# Altium PCB li-ion-18650-capacity-meter.PcbDoc
Units mm, origin at the board's own origin, x right, y up, seen from the top; angles counter-clockwise.
Board outline 85 x 70 mm, 2 copper layers (Top Layer, Bottom Layer), stack 1.571 mm thick; 48 components, 35 nets, 160 pads, 8 vias.
Unrouted connection lines stored in the file: 1.
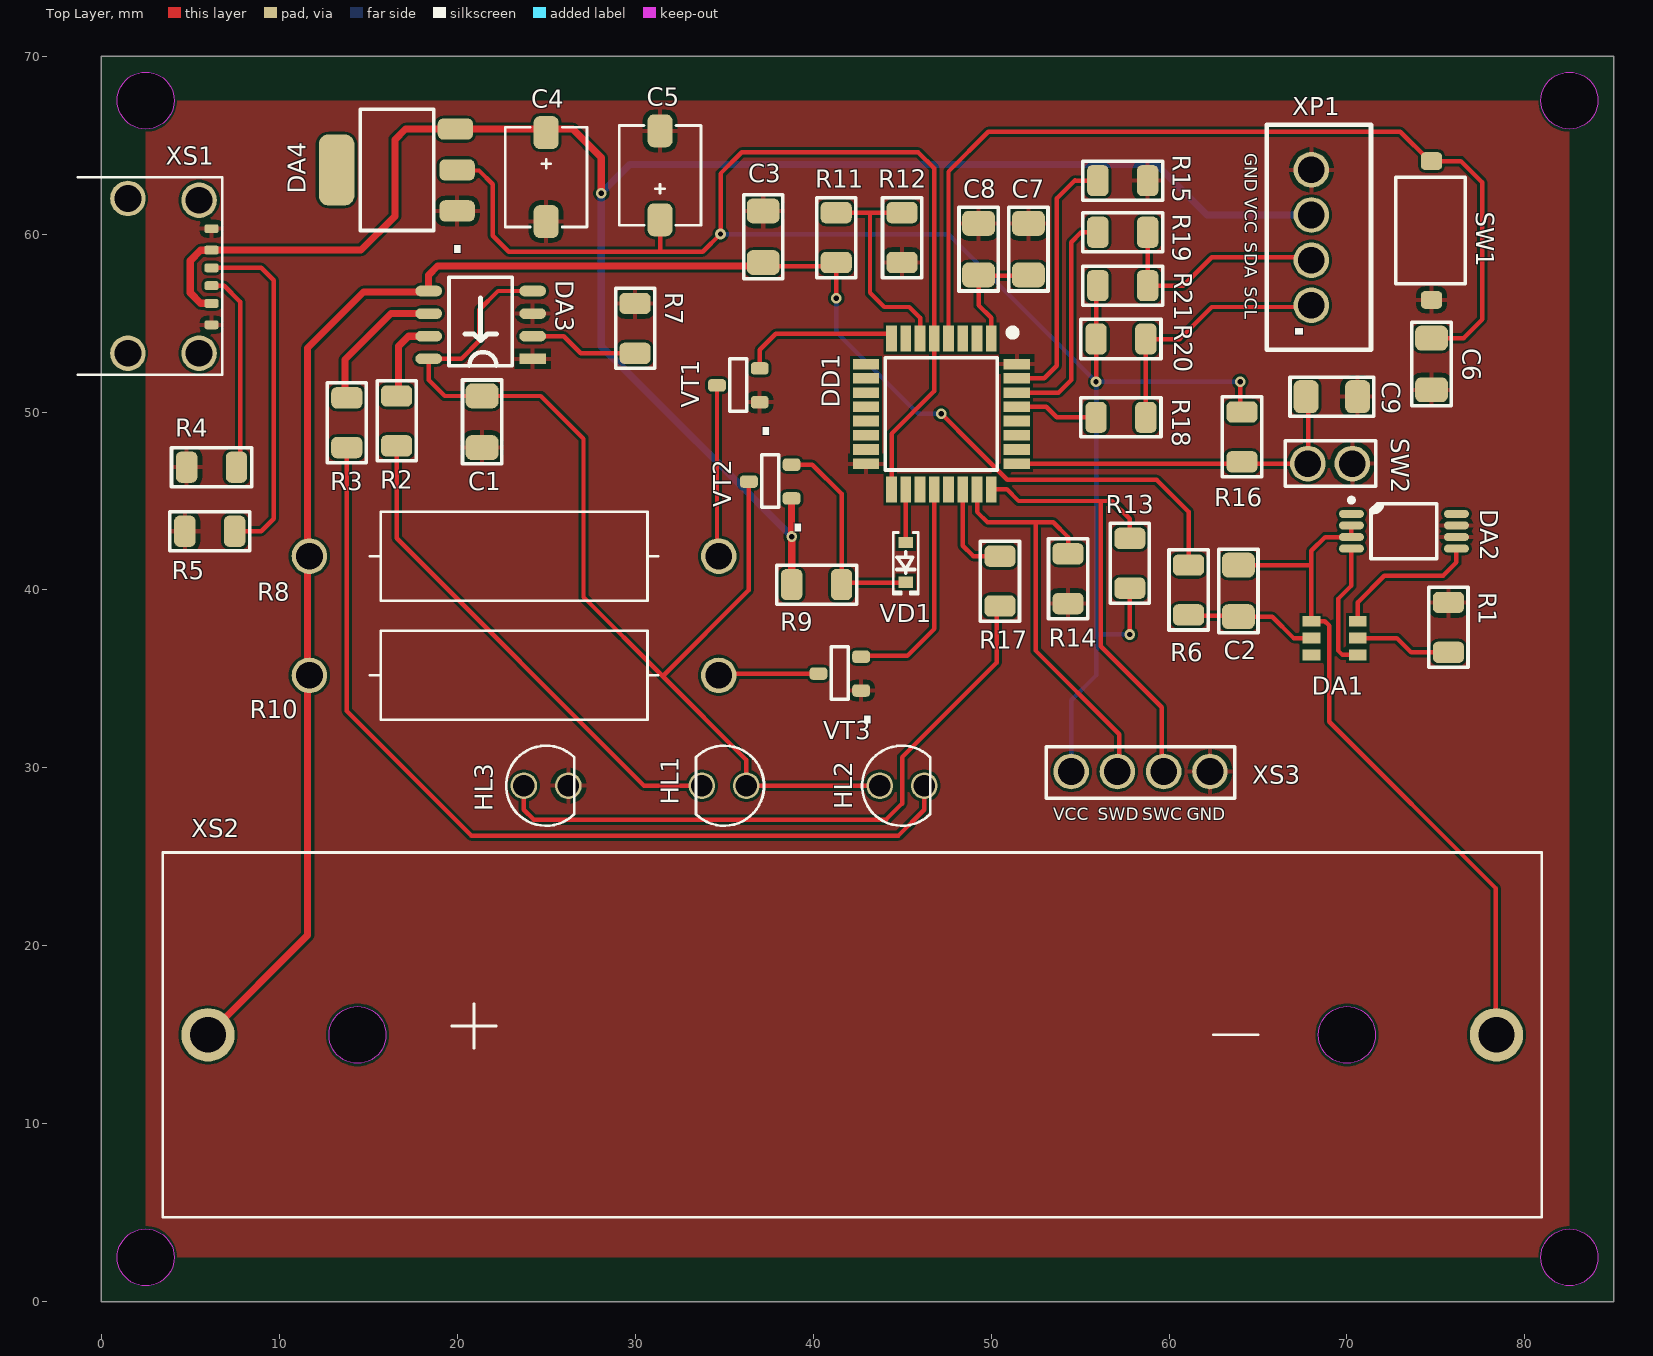
[diagram p0: Top Layer view]
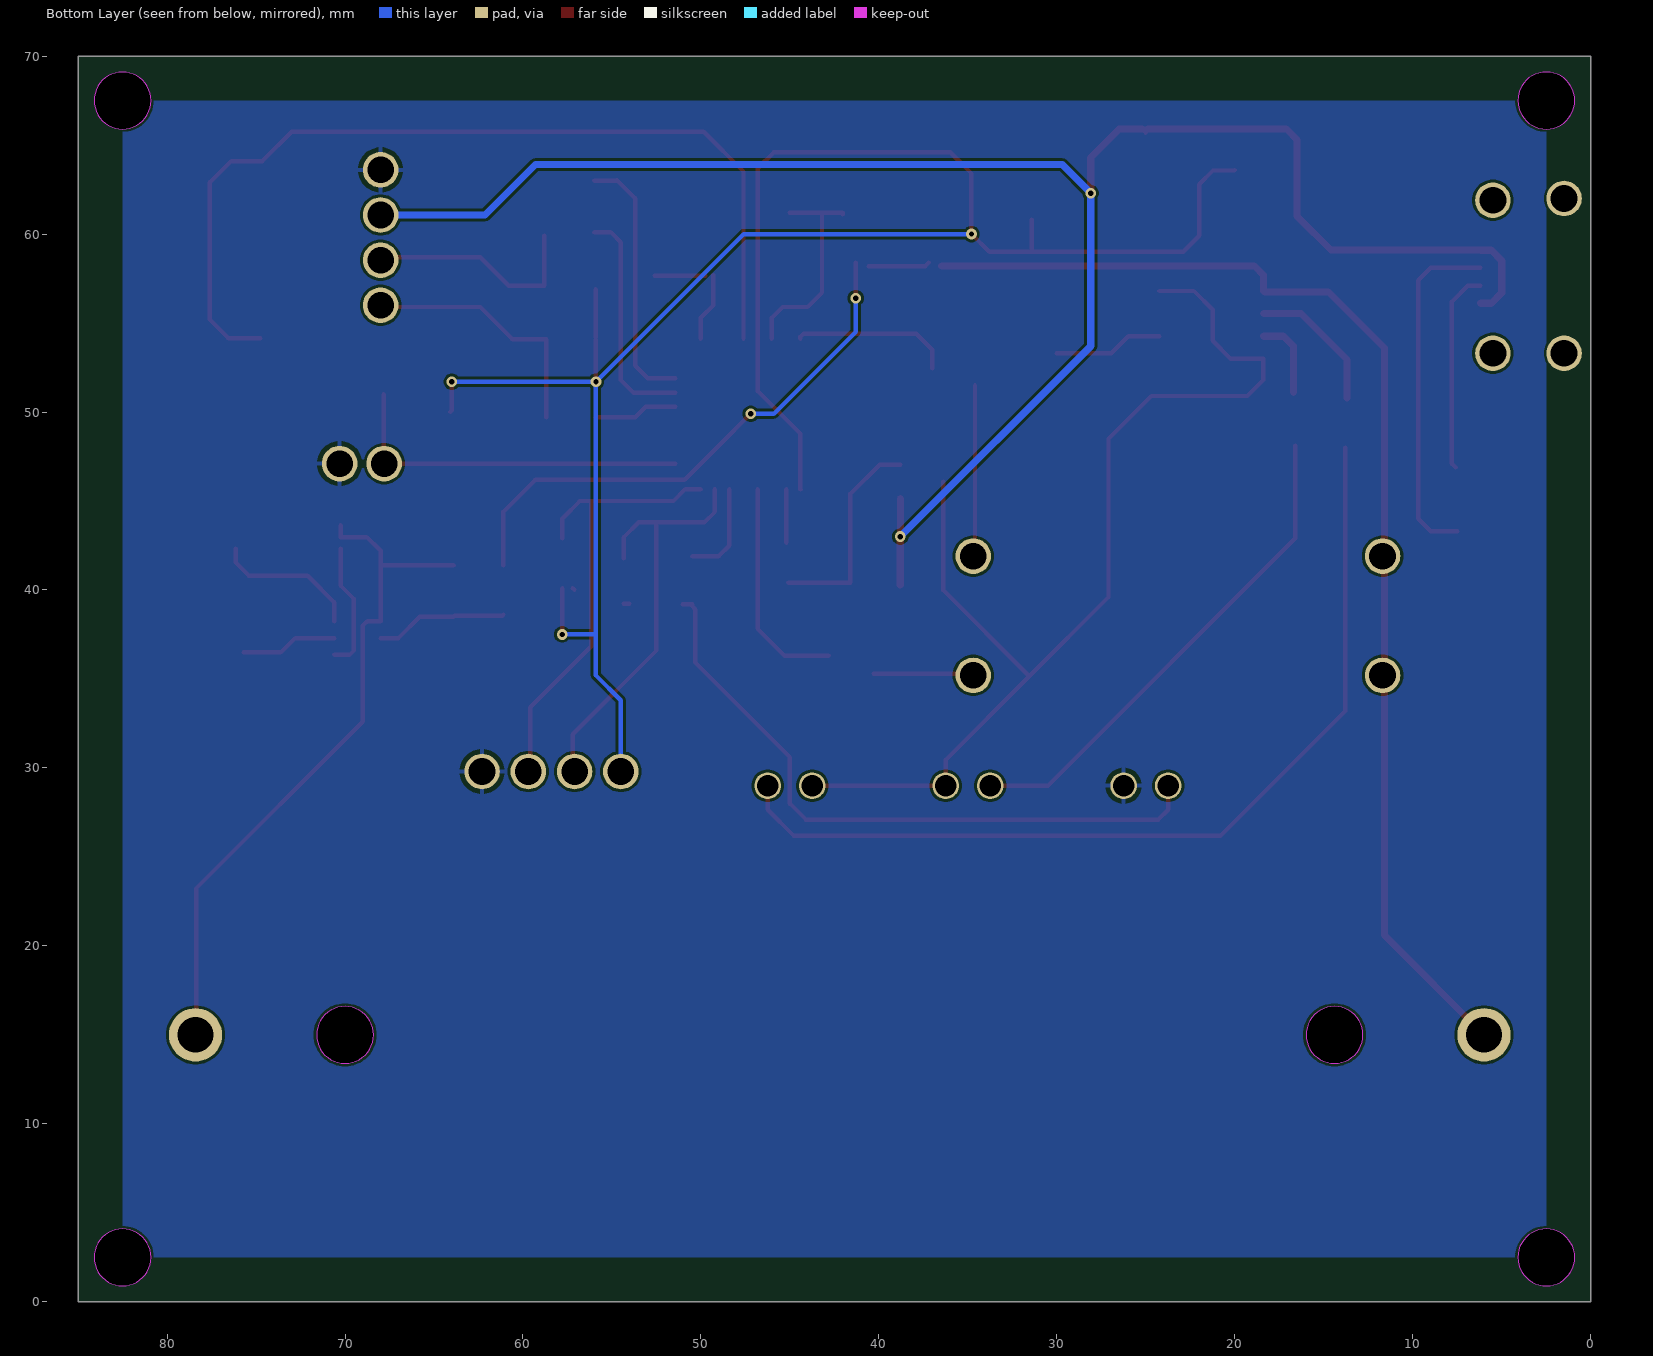
[diagram p1: Bottom Layer view, seen from below]
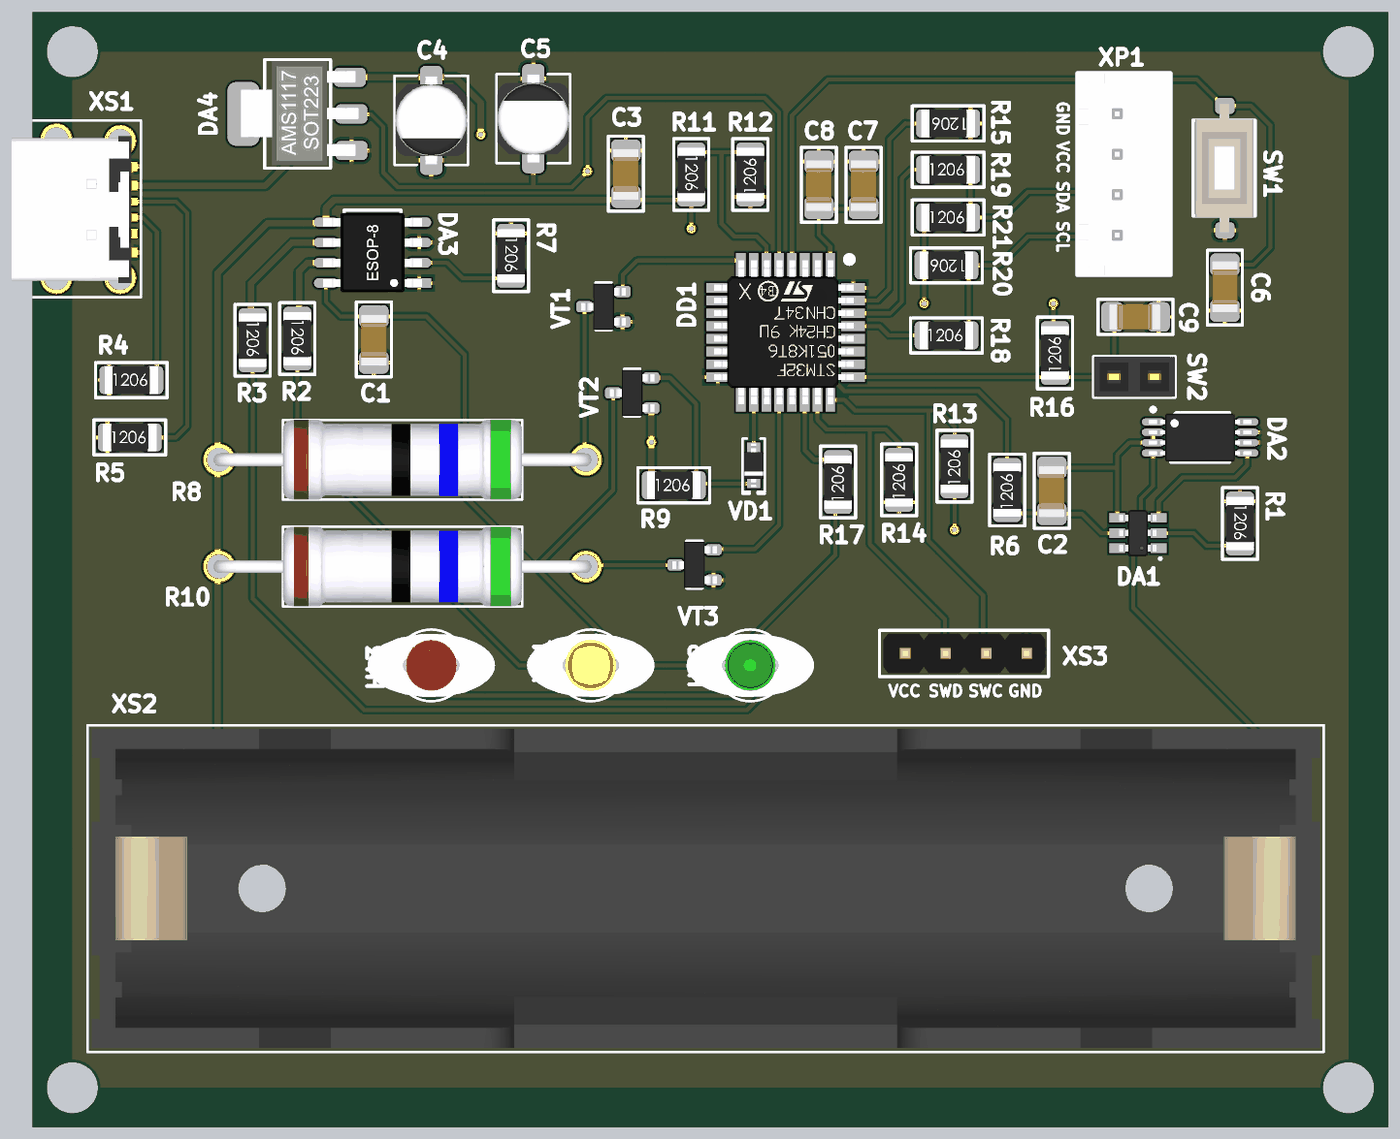
[diagram p2: 3D render of the assembled board from above, using the file's embedded part models]

## Layer stack, top to bottom
Top Solder: solder mask 0.0102, Solder Resist, Dk 3.5
Top Layer: signal copper 0.0356
Dielectric 1: dielectric 1.5, FR-4, Dk 4.8
Bottom Layer: signal copper 0.0356
Bottom Solder: solder mask 0.0102, Solder Resist, Dk 3.5

## Board outline
0,0 85,0 85,70 0,70
cut-out: 2.5,4.1 cw(c2.5,2.5) 4.1,2.5 cw(c2.5,2.5) 2.5,0.9 cw(c2.5,2.5) 0.9,2.5 cw(c2.5,2.5)
cut-out: 82.5,4.1 cw(c82.5,2.5) 84.1,2.5 cw(c82.5,2.5) 82.5,0.9 cw(c82.5,2.5) 80.9,2.5 cw(c82.5,2.5)
cut-out: 82.5,69.1 cw(c82.5,67.5) 84.1,67.5 cw(c82.5,67.5) 82.5,65.9 cw(c82.5,67.5) 80.9,67.5 cw(c82.5,67.5)
cut-out: 2.5,69.1 cw(c2.5,67.5) 4.1,67.5 cw(c2.5,67.5) 2.5,65.9 cw(c2.5,67.5) 0.9,67.5 cw(c2.5,67.5)

## Design rules (kind name [scope] priority, off if disabled: settings)
Clearance "Clearance-2 1 Oz" [All] p1: gap=0.15 ignorepadtopadclearanceinfootprint=FALSE // Advance
PolygonConnect [All] p1: connectstyle=Relief reliefconductorwidth=0.254 reliefentries=4 polygonreliefangle="90 Angle" airgapwidth=0.254
RoutingVias [All] p1: holewidth=0.3 width=0.6 viastyle="Through Hole" minholewidth=0.2 minwidth=0.4 maxholewidth=5.9 maxwidth=6.4
SolderMaskExpansion [All] p1: expansion=0.102 istentingtop=FALSE
Width "Width 1 Oz" [All] p1: maxlimit=10 minlimit=0.15 preferedwidth=0.25 minimp=50.000000 maximp=50.000000 favimp=50.000000 checkconnectedcopper=TRUE
30 further rules are at their usual default settings.

## Components (designator, comment, footprint, x,y, rotation, side; value= is the part's Value field where it differs from the comment)
C1 "0.1 µF" C_1206 21.4,50.9 r270 top
C2 "0.1 µF" C_1206 63.9,41.4 r270 top
C3 "10 µF" C_1206 37.2,61.3 r270 top
C4 "10 µF" C_ECAP_SMD_4mm 25,63.2 r90 top
C5 "10 µF" C_ECAP_SMD_4mm 31.4,63.3 r270 top
C6 "0.1 µF" C_1206 74.75,51.25 r90 top
C7 "0.1 µF" C_1206 52.1,60.6 r270 top
C8 "0.1 µF" C_1206 49.3,60.6 r270 top
C9 "0.1 µF" C_1206 70.598,50.864 r180 top
DA1 "DW01A" DA_SOT-23-6 70.6,37.3 r90 top
DA2 "FS8205A" DA_TSSOP-8_FS8205A 73.2,43.3 r0 top
DA3 "TP4056" DA_TP4056 24.369,52.99 r180 top
DA4 "AMS1117-3.3" DA_SOT-223_AMS1117 20,61.3 r180 top
DD1 "STM32F051K8T6" DD_LQFP-32_STM32 47.21,49.89 r270 top
HL1 "*" HL_LED_Yellow_3mm 35,29 r180 top
HL2 "*" HL_LED_Green_3mm 45,29 r0 top
HL3 "*" HL_LED_Red_3mm 25,29 r0 top
R1 "1 kΩ" R_1206 75.7,39.45 r270 top
R2 "200 Ω" R_1206 16.6,51.05 r270 top
R3 "200 Ω" R_1206 13.8,50.95 r270 top
R4 "5.1 kΩ" R_1206 4.65,46.9 r0 top
R5 "5.1 kΩ" R_1206 4.55,43.3 r0 top
R6 "100 Ω" R_1206 61.1,38.45 r90 top
R7 "1.2 kΩ" R_1206 30,56.25 r270 top
R8 "10 Ω" R_C2-23 23.2,41.9 r180 top
R9 "510 Ω" R_1206 38.65,40.3 r0 top
R10 "20 Ω" R_C2-23 23.2,35.2 r180 top
R11 "10 kΩ" R_1206 41.3,61.35 r270 top
R12 "10 kΩ" R_1206 45,58.25 r90 top
R13 "10 kΩ" R_1206 57.8,39.95 r90 top
R14 "10 kΩ" R_1206 54.327,39.085 r90 top
R15 "10 kΩ" R_1206 58.95,63 r180 top
R16 "10 kΩ" R_1206 64.1,47.05 r90 top
R17 "100 Ω" R_1206 50.5,38.95 r90 top
R18 "100 Ω" R_1206 55.75,49.7 r0 top
R19 "100 Ω" R_1206 55.85,60.1 r0 top
R20 "4.7 kΩ" R_1206 58.85,54.1 r180 top
R21 "4.7 kΩ" R_1206 55.85,57.1 r0 top
SW1 "*" SW_Button_SMD 74.75,64 r270 top
SW2 "*" PBS-2 67.8,47.1 r0 top
VD1 "BZT52C3V3S" VD_SOD-323 45.41,41.5 r270 top
VT1 "IRLML2502" VT_SOT-23 35.8,51.5 r180 top
VT2 "IRLML6402" VT_SOT-23 37.593,46.092 r180 top
VT3 "IRLML2502" VT_SOT-23 41.5,35.3 r180 top
XP1 "*" X_XH_4Pin_2.54mm 68,59.8 r270 top
XS1 "*" X_USB-C_6Pin 4,57.6 r270 top
XS2 "*" X_KLS5_18650_D 42.2,15 r0 top
XS3 "*" X_Arduino_4Pin 54.5,29.8 r0 top

## Footprints (in the part's own frame and the unit in brackets; to place one, negate y for a bottom-side part, rotate by r counter-clockwise, add the part's x,y. Pads: shape width x height; smd on the part's side, far side on the other; paste and mask are expansions set on the pad)
C_1206 [mm] "1206 SMD ceramic capacitor land pattern for Murata GRM319R72A104KA01D and GRM31CR61A106KA01L."
  rrect50% 1.4x1.85 smd: 1(0,0) 2(2.9,0)
  silkscreen extent -0.9,-1.1 3.8,1.1, body extent -0.1,-0.8 3.1,0.8, height 1
C_ECAP_SMD_4mm [mm] "Polarized SMD capacitor footprint, 4 mm body, used for JB Capacitors JCK1C100M040054."
  rrect50% 1.85x1.4 smd: 1(-2.5,0) 2(2.5,0)
  silkscreen extent -2.8,-2.3 2.8,2.3, body extent -2.75,-2.25 2.75,2.25, height 5.5
DA_SOT-23-6 [mm] "Project footprint assigned to DW01A. Original library note: SOT143-4 per SP0503BAHTG (WRONG PIN ORDER). Verify pad numbering before use."
  round 0.3 on Top Overlay: 1(-1.6,-0.1)
  rect 0.6x1 smd: 1(-0.95,0) 2(0,0) 3(0.95,0) 4(-0.95,2.6) 5(0,2.6) 6(0.95,2.6)
  body extent -1.46,0.13 1.46,2.47, height 1
DA_SOT-223_AMS1117 [mm] "SOT-223 regulator footprint used for the UMW AMS1117-3.3."
  rrect55% 2x1.2 smd: 1(0,0) 2(0,-2.3) 3(0.1,-4.6)
  rrect55% 2x4 smd: 4(6.775,-2.3)
  silkscreen extent 1.32,-5.7 5.45,1.1, body extent -0.45,-5.58 6.92,0.92, height 1.8
DA_TP4056 [mm] "Eight-pad SMD footprint used for the UMW TP4056 single-cell charger."
  rect 1.5x0.6 smd: 1(0.127,0)
  oval 1.5x0.6 smd: 2(0.127,-1.27) 3(0.127,-2.54) 4(0.127,-3.81) 5(5.969,-3.81) 6(5.969,-2.54) 7(5.969,-1.27) 8(5.969,0)
  silkscreen extent 1.27,-4.57 4.83,0.38, body extent -0.05,-4.41 6.15,0.6, height 1.82
DA_TSSOP-8_FS8205A [mm] "Eight-lead TSSOP footprint used for the FS8205A dual MOSFET in the cell protection circuit."
  oval 1.4x0.45 smd: 1(-2.95,0.975) 2(-2.95,0.325) 3(-2.95,-0.325) 4(-2.95,-0.975) 5(2.95,-0.975) 6(2.95,-0.325) 7(2.95,0.325) 8(2.95,0.975)
  silkscreen extent -3.07,-1.55 1.85,1.87, body extent -3.21,-1.5 3.21,1.5, height 1.2
DD_LQFP-32_STM32 [mm] "32-lead LQFP footprint used for the STMicroelectronics STM32F051K8T6."
  rect 1.475x0.6 smd: 1(-4.238,2.8) 2(-4.238,2) 3(-4.238,1.2) 4(-4.238,0.4) 5(-4.238,-0.4) 6(-4.238,-1.2) 7(-4.238,-2) 8(-4.238,-2.8) 17(4.238,-2.8) 18(4.238,-2) 19(4.238,-1.2) 20(4.238,-0.4) 21(4.238,0.4) 22(4.238,1.2) 23(4.238,2) 24(4.238,2.8)
  rect 0.6x1.475 smd: 9(-2.8,-4.238) 10(-2,-4.238) 11(-1.2,-4.238) 12(-0.4,-4.238) 13(0.4,-4.238) 14(1.2,-4.238) 15(2,-4.238) 16(2.8,-4.238) 25(2.8,4.238) 26(2,4.238) 27(1.2,4.238) 28(0.4,4.238) 29(-0.4,4.238) 30(-1.2,4.238) 31(-2,4.238) 32(-2.8,4.238)
  silkscreen extent -4.77,-3.15 3.15,4.2, body extent -4.52,-4.48 4.5,4.28, height 1.4
HL_LED_Green_3mm [mm] "3 mm green indicator LED footprint for G-nor GNL-3014GD, 565 nm."
  round 1.5 hole 1.2: 1(-1.25,0) 2(1.25,0)
  silkscreen extent -2.25,-2.25 1.58,2.25, body extent -4,-2 4,2, height 24.6
HL_LED_Red_3mm [mm] "3 mm red indicator LED footprint for G-nor GNL-3014HD, 700 nm."
  round 1.5 hole 1.2: 1(-1.25,0) 2(1.25,0)
  silkscreen extent -2.25,-2.25 1.58,2.25, body extent -4,-2 4,2, height 24.6
HL_LED_Yellow_3mm [mm] "3 mm yellow indicator LED footprint for G-nor GNL-3014YD, 585 nm."
  round 1.5 hole 1.2: 1(-1.25,0) 2(1.25,0)
  silkscreen extent -2.25,-2.25 1.58,2.25, body extent -4,-2 4,2, height 24.6
PBS-2 [mm]
  round 2 hole 1.5: 1(0,0) 2(2.5,0)
  silkscreen extent -1.28,-1.28 3.83,1.28, body extent -1.27,-1.27 3.81,1.27, height 8.5
R_1206 [mm] "1206 SMD resistor land pattern used for Yageo RC1206 series chip resistors."
  rrect50% 1.2x1.75 smd: 1(0.15,0) 2(2.95,0)
  silkscreen extent -0.7,-1.1 3.8,1.1, body extent -0.12,-0.86 3.23,0.87, height 0.85
R_C2-23 [mm] "Axial resistor footprint assigned to the Yageo MO-200 power resistors at R8 and R10."
  round 2 hole 1.5: 1(-11.5,0) 2(11.5,0)
  silkscreen extent -8.1,-2.5 8.1,2.5, body extent -11.83,-2.5 11.83,2.5, height 6.5
SW_Button_SMD [mm] "Two-pad SMD tactile switch footprint assigned to SW1, RUICHI IT-1181A, 6 x 3 x 2.5 mm."
  rrect50% 1x1.2 smd: 1(-0.1,0) 2(7.7,0)
  silkscreen extent 0.8,-2 6.8,1.9, body extent -0.23,-1.86 7.83,1.8, height 2.51
VD_SOD-323 [mm] "Two-terminal SOD-323 diode land pattern used for the BZT52C3V3S Zener diode."
  rect 0.625x0.83 smd: 1(-1.162,-0.2) 2(1.062,-0.2)
  silkscreen extent -1.73,-0.9 1.73,0.5, body extent -1.41,-0.83 1.31,0.42, height 1.05
VT_SOT-23 [mm] "Three-lead SOT-23 transistor footprint used for the IRLML2502 and IRLML6402 MOSFETs."
  rrect55% 1x0.7 smd: 1(-1.2,0.95) 2(-1.2,-0.95) 3(1.2,0)
  silkscreen extent -0.48,-1.5 0.48,1.45, body extent -1.4,-1.45 1.4,1.45, height 1.29
X_Arduino_4Pin [mm] "Four-position socket footprint assigned to the Connfly DS1021-1*4SF11-B SWD connector."
  round 2 hole 1.5: 1(0,0) 2(2.6,0) 3(5.2,0) 4(7.8,0)
  silkscreen extent -1.4,-1.5 9.2,1.4, body extent -1.16,-1.3 9,1.2, height 8.2
X_KLS5_18650_D [mm] "Battery-holder footprint for KLS KLS5-18650-D, one 18650 cell."
  round 3 hole 2: 1(-36.2,0) 2(36.2,0)
  Keep-Out Layer board cut-out: -27.8,1.6 -27.188,1.478 -26.669,1.131 -26.322,0.612 -26.2,0 -26.2,0 -26.322,-0.612 -26.669,-1.131 -27.188,-1.478 -27.8,-1.6 -27.8,-1.6 -28.412,-1.478 -28.931,-1.131 -29.278,-0.612 -29.4,0 -29.4,0 -29.278,0.612 -28.931,1.131 -28.412,1.478 -27.8,1.6
  Keep-Out Layer board cut-out: 27.8,1.6 28.412,1.478 28.931,1.131 29.278,0.612 29.4,0 29.4,0 29.278,-0.612 28.931,-1.131 28.412,-1.478 27.8,-1.6 27.8,-1.6 27.188,-1.478 26.669,-1.131 26.322,-0.612 26.2,0 26.2,0 26.322,0.612 26.669,1.131 27.188,1.478 27.8,1.6
  silkscreen extent -38.75,-10.25 38.75,10.25, body extent -38.5,-10 38.5,10, height 21
X_USB-C_6Pin [mm] "USB Type-C receptacle footprint used for the six-contact RUICHI 06PF-027 power connector."
  rrect50% 0.5x0.8 smd: C1(-2.7,2.2) C2(-1.5,2.2) C3(-0.5,2.2) C4(0.5,2.2) C5(1.5,2.2) C6(2.7,2.2)
  round 2 hole 1.5 unplated: S(-4.4,-2.5) S(-4.3,1.5) S(4.3,1.5) S(4.3,-2.5)
  silkscreen extent -5.6,-5.3 5.5,2.8, body extent -4.6,-5.35 4.6,2.6, height 3.2
X_XH_4Pin_2.54mm [mm] "Four-position XH header footprint assigned to JST B4B-XH-A(LF)(SN). Check pad pitch against the mating part."
  round 2 hole 1.5: 1(3.8,0) 2(1.27,0) 3(-1.27,0) 4(-3.81,0)
  silkscreen extent -6.35,-2.5 6.3,3.35, body extent -6.31,-2.4 6.31,3.3, height 7.03

## Part data
C1 C2 C3 C6 C7 C8 C9: library part C_NonPolarized, "Multilayer ceramic capacitor, 10% tolerance"
C4 C5: library part C_Polarized, "Polarized electrolytic capacitor, 10 µF, 16 V, 20% tolerance"
DA1: library part DA_DW01A, "Single-cell Li-ion battery protection controller"
DA2: library part DA_FS8205A, "Dual N-channel power MOSFET"
DA3: library part DA_TP4056, "Single-cell linear Li-ion battery charger with charge-status outputs"
DA4: library part DA_AMS1117, "Fixed-output linear voltage regulator, 3.3 V"
DD1: library part DD_STM32_LQFP32, "32-bit Arm Cortex-M0 microcontroller, 48 MHz, 64 KB Flash"
HL1 HL2 HL3: library part HL_LED, "Indicator LED, 60-degree viewing angle"
R1 R2 R3 R4 R5 R6 R7 R8 R9 R10 R11 R12 R13 R14 R15 R16 R17 R18 R19 R20 R21: library part R_Resistor, "Fixed resistor"
SW1 SW2: library part SW_Switch, "Two-terminal switch"
VD1: library part VD_Zener, "Zener diode, 3.3 V, 0.2 W"
VT1 VT3: library part VT_MOSFET-N, "N-channel power MOSFET, 20 V"
VT2: library part VT_MOSFET-P, "P-channel power MOSFET, -20 V"
XP1: library part XP_Connector_4Pin, "4-position plug connector"
XS1: library part XS_USB-C, "USB Type-C power receptacle, 6 contacts"
XS2: library part XS_Connector_2Pin, "Single-cell 18650 battery holder"
XS3: library part XS_Connector_4Pin, "4-position socket connector"

## Via types
v1: diameter 0.6, hole 0.3, Top Layer to Bottom Layer, 8 vias

## Nets (pads, with @x,y where several pads share a name; then routed paths per layer and width w, separated by ;. In a path a pad name is that pad's centre, name@x,y a point inside that pad or via, vN(x,y) a via of type N, cw(c..) or ccw(c..) an arc to the next point about the centre after c; other vN are vias at no path point)
+3,3В: C5.2 C7.2 C8.2 DA4.2 DD1.1 DD1.5 DD1.17 R13.1 R16.2 R20.2 R21.1 XS3.1 | length 129.1
  Top Layer w0.25: DA4.2 20.029,63.571 21.229,63.571 22,62.8 22,59.9 22.9,59 33.8,59 v1(34.8,60) 34.8,63.4 36,64.6 45.9,64.6 46.81,63.69 DD1.5 46.81,51.177 44.41,48.778 DD1.17 DD1.17@44.396,45.666 ; 31.4,59.1 C5.2 ; C8.2 49.3,56 50.01,55.29 DD1.1 ; C8.2@49.77,57.65 C7.2@52.6,57.65 ; v1(55.9,51.7) R20.2 ; R20.2@55.9,54.2 R21.1@55.9,56.9 ; R13.1@57.125,40.025 R13.1@57.2,40.1 ; v1(57.8,37.5) R13.1 ; v1(64,51.7) 64,50.1 R16.2
  Bottom Layer w0.25: v1(34.8,60) 47.6,60 v1(55.9,51.7) ; XS3.1 54.5,33.8 55.9,35.2 55.9,37.5 ; v1(57.8,37.5) 55.9,37.5 ; v1(64,51.7) v1(55.9,51.7) ; 55.9,37.5 v1(55.9,51.7)
+5В: C4.2 DA4.3 R9.1 VT2.1 XP1.3 XS1.C2 XS1.C5 | length 105.1
  Top Layer w0.25: C4.2@24.91,65.9 C4.2@25.02,65.79 ; C4.2 C4.2@25.2,65.9
  Top Layer w0.4: XS1.C5 6.187,56.113 5.587,56.113 5,56.7 5,58.5 5.587,59.087 6.187,59.087 XS1.C2 ; XS1.C2@6.2,59.096 14.596,59.096 16.5,61 16.5,65.3 17.1,65.9 DA4.3 C4.2@24.91,65.9 ; C4.2@25.2,65.9 26.5,65.9 28.1,64.3 v1(28.1,62.3) ; VT2.1 38.797,45.139 38.797,43.003 v1(38.8,43) R9.1@38.8,40.272
  Bottom Layer w0.4: v1(38.8,43) 28.1,53.7 v1(28.1,62.3) 29.7,63.9 59.3,63.9 62.13,61.07 XP1.3
GND: C1.2 C3.1 C4.1 C5.1 C6.1 C7.1 C8.1 C9.1 DA2.6 DA2.7 DA3.1 DA3.3 DA4.1 DD1.16 DD1.32 HL3.2 R1.1 R4.1 R5.1 R7.1 R12.1 R14.1 R15.1 SW1.2 SW2.2 VT1.1 VT3.1 XP1.4 XS1.C1 XS1.C6 XS3.4 | length 0.4
  Top Layer w0.25: R14.1@54.027,39.235 R14.1 ; SW2.2@70.25,46.8 SW2.2@70.325,46.875
NetC1_1: C1.1 DA3.4 DA3.8 HL1.1 HL2.1 VT2.3 | length 63.4
  Top Layer w0.25: DA3.4 22.3,56.8 21.25,55.75 21.25,54 20.24,52.99 DA3.8 18.4,51.8 19.3,50.9 C1.1 24.7,50.9 27.1,48.5 27.1,39.6 31.55,35.15 ; VT2.3 36.393,39.993 31.55,35.15 ; HL2.1 HL1.1 36.25,30.45 31.55,35.15
NetC2_1: C2.1 DA1.6 DA2.2 DA2.3 XS2.2 | length 39.3
  Top Layer w0.25: C2.1 67.9,41.4 68,41.3 ; DA2.2 DA2.3 68.772,42.975 68,42.203 68,41.4 68,41.3 ; XS2.2@78.35,15 78.35,23.25 69,32.6 69,38 68.75,38.25 DA1.6 68,41.3
NetC2_2: C2.2 DA1.5 R6.1 | length 7.4
  Top Layer w0.25: R6.1 61.15,38.55 63.85,38.55 C2.2 65.8,38.5 67,37.3 DA1.5
NetC3_2: C3.2 DA3.5 R6.2 R8.2 R10.2 R11.2 XS2.1 | length 102.7
  Top Layer w0.25: C3.2 37.4,58.2 R11.2@40.563,58.2 ; v1(41.3,56.4) R11.2 ; v1(47.2,49.9) 47.212,49.9 49.032,48.08 50.912,46.2 59.3,46.2 61.1,44.4 R6.2
  Top Layer w0.4: XS2.1 11.6,20.6 11.6,53.6 14.735,56.735 18.335,56.735 DA3.5 18.4,57.7 18.9,58.2 C3.2@36.494,58.2
  Bottom Layer w0.25: v1@41.3,56.495 41.3,54.5 45.9,49.9 v1(47.2,49.9)
NetC6_2: C6.2 DD1.4 SW1.1 | length 52.5
  Top Layer w0.25: DD1.4 47.61,63.51 49.85,65.75 73,65.75 74.65,64.1 SW1.1 76.4,64.1 77.6,62.9 77.6,55.2 76.55,54.15 C6.2
NetC9_2: C9.2 DD1.25 R16.1 SW2.1 | length 20.5
  Top Layer w0.25: DD1.25 64.1,47.09 67.46,47.09 SW2.1@67.75,46.8 ; SW2.1@67.825,46.875 C9.2@67.825,50.991
NetDA1_1: DA1.1@70.6,36.35 DA2.4 | length 7.2
  Top Layer w0.25: DA2.4 70.25,40.247 69.5,39.497 69.5,36.6 69.75,36.35 DA1.1@70.6,36.35
NetDA1_2: DA1.2 R1.2 | length 5.4
  Top Layer w0.25: DA1.2 72.8,37.3 73.6,36.5 R1.2
NetDA1_3: DA1.3 DA2.5 | length 8.3
  Top Layer w0.25: DA1.3 70.6,39.3 72.1,40.8 75.4,40.8 76.15,41.55 DA2.5
NetDA3_2: DA3.2 R7.2 | length 6.2
  Top Layer w0.25: DA3.2 25.99,54.26 26.95,53.3 R7.2
NetDA3_6: DA3.6 R3.1 | length 7.9
  Top Layer w0.4: R3.1@13.7,50.8 13.7,52.95 16.28,55.53 DA3.6
NetDA3_7: DA3.7 R2.1 | length 4.5
  Top Layer w0.4: R2.1@16.7,51.1 16.7,53.7 17.26,54.26 DA3.7
NetDD1_6: DD1.6 R11.1 R12.2 | length 12
  Top Layer w0.25: R11.1@42.037,61.101 42.037,61.2 43.2,61.2 R12.2 ; 43.2,61.101 43.2,56.697 43.997,55.9 45.4,55.9 46.01,55.29 DD1.6
NetDD1_8: DD1.8 VT1.2 | length 9
  Top Layer w0.25: VT1.2 37,53.5 37.9,54.4 44.235,54.4 44.41,54.225 DD1.8
NetDD1_18: DD1.18 VD1.1 | length 3
  Top Layer w0.25: VD1.1 DD1.18
NetDD1_20: DD1.20 VT3.2 | length 12.5
  Top Layer w0.25: VT3.2@42.827,36.3 45.3,36.3 46.81,37.81 DD1.20
NetDD1_22: DD1.22 R17.2 | length 5.5
  Top Layer w0.25: DD1.22 48.41,42.49 48.996,41.904 50.496,41.904 R17.2
NetDD1_23: DD1.23 R14.2 XS3.2 | length 23.9
  Top Layer w0.25: DD1.23 49.214,45.648 49.214,44.386 49.8,43.8 52.5,43.8 ; R14.2@54.327,41.782 R14.2 54.327,42.973 53.5,43.8 52.5,43.8 ; XS3.2@57.2,30 57.2,31.9 52.5,36.6 52.5,43.8
NetDD1_24: DD1.24 R13.2 XS3.3 | length 26.2
  Top Layer w0.25: DD1.24 50.894,45.652 51.546,45 56.162,45 ; R13.2 57.8,44 56.8,45 56.162,45 ; XS3.3 59.587,29.913 59.587,33.413 56.162,36.838 56.162,45
NetDD1_29: DD1.29 R18.1 | length 4.7
  Top Layer w0.25: DD1.29 53.11,50.29 53.7,49.7 R18.1
NetDD1_30: DD1.30 R19.1 | length 12.8
  Top Layer w0.25: DD1.30 53.79,51.09 54.5,51.8 54.5,59.541 55.059,60.1 R19.1
NetDD1_31: DD1.31 R15.2 | length 14.7
  Top Layer w0.25: DD1.31 52.99,51.89 53.7,52.6 53.7,62 54.719,63.019 54.737,63 R15.2
NetHL1_2: HL1.2 R2.2 | length 28.1
  Top Layer w0.25: R2.2 16.6,42.9 30.5,29 HL1.2
NetHL2_2: HL2.2 R3.2 | length 52.1
  Top Layer w0.25: R3.2 13.8,33.2 20.8,26.2 44.8,26.2 46.25,27.65 HL2.2
NetHL3_1: HL3.1 R17.1 | length 37.2
  Top Layer w0.25: HL3.1 23.75,27.65 24.3,27.1 44.1,27.1 45,28 45,30.6 50.32,35.92 50.32,38.92 R17.1 50.5,39.2 R17.1@51.028,39.2
NetR4_2: R4.2 XS1.C4 | length 11.4
  Top Layer w0.25: XS1.C4 6.207,57.093 6.907,57.093 7.8,56.2 7.8,47.1 R4.2
NetR5_2: R5.2 XS1.C3 | length 19.7
  Top Layer w0.25: XS1.C3 9,58.1 9.7,57.4 9.7,44 9,43.3 R5.2
NetR8_1: R8.1 VT1.3 | length 9.6
  Top Layer w0.25: VT1.3 34.6,42 R8.1
NetR9_2: R9.2 VD1.2 VT2.2 | length 12
  Top Layer w0.25: VT2.2 39.958,47.042 41.6,45.4 41.6,40.4 VD1.2@45.1,40.4
NetR10_1: R10.1 VT3.3 | length 5.6
  Top Layer w0.25: R10.1 34.8,35.3 VT3.3
NetR18_2: R18.2 R20.1 XP1.1 | length 14.6
  Top Layer w0.25: R18.2 R20.1 60.6,54.1 62.4,55.9 XP1.1@68.123,55.9
NetR19_2: R19.2 R21.2 XP1.2 | length 12.7
  Top Layer w0.25: R19.2@58.8,59.9 R21.2 60.8,57.1 62.4,58.7 XP1.2@68,58.7
pads on no net: DA1.1@70.7,35.7 DA1.4 DA2.1 DA2.8 DA4.4 DD1.2 DD1.3 DD1.7 DD1.9 DD1.10 DD1.11 DD1.12 DD1.13 DD1.14 DD1.15 DD1.19 DD1.21 DD1.26 DD1.27 DD1.28 XS1.S

## Polygon pours and split planes (outlines as drawn)
GND on Bottom Layer "GND_Bottom" (solid, pour order 12): 2.5,67.5 82.5,67.5 82.5,2.5 2.5,2.5
GND on Top Layer "GND_Top" (solid, pour order 13): 2.5,67.5 2.5,2.5 82.5,2.5 82.5,67.5

## Silkscreen, mask and mechanical layers (free items; w line width, h text height)
Mechanical 1:
  circle w0.254: c2.5,2.5 r1.6
  circle w0.254: c82.5,2.5 r1.6
  circle w0.254: c82.5,67.5 r1.6
  circle w0.254: c2.5,67.5 r1.6

## Text inside footprints (layer, text, board x,y; h text height)
XP1: Top Overlay "SDA" at 64.254,59.546 h0.7 r270; Top Overlay "SCL" at 64.254,57.046 h0.7 r270; Top Overlay "VCC" at 64.254,62.046 h0.7 r270; Top Overlay "GND" at 64.254,64.546 h0.7 r270
XS3: Top Overlay "SWD" at 56.004,27.054 h0.7; Top Overlay "SWC" at 58.504,27.054 h0.7; Top Overlay "VCC" at 53.504,27.054 h0.7; Top Overlay "GND" at 61.004,27.054 h0.7